# Altium PCB NB3000XN.PcbDoc (part 62 of 71)
Units mil, origin at the board's own origin, x right, y up, seen from the top; angles counter-clockwise.
Board outline 9527.56 x 6929.77 mil, 6 copper layers (Top Layer, GND+SHIELD, MidLayer1, MidLayer2, P2 - 3V3+5V0, Bottom Layer), stack 62.375 mil thick; 832 components, 1027 nets, 4655 pads, 4981 vias.
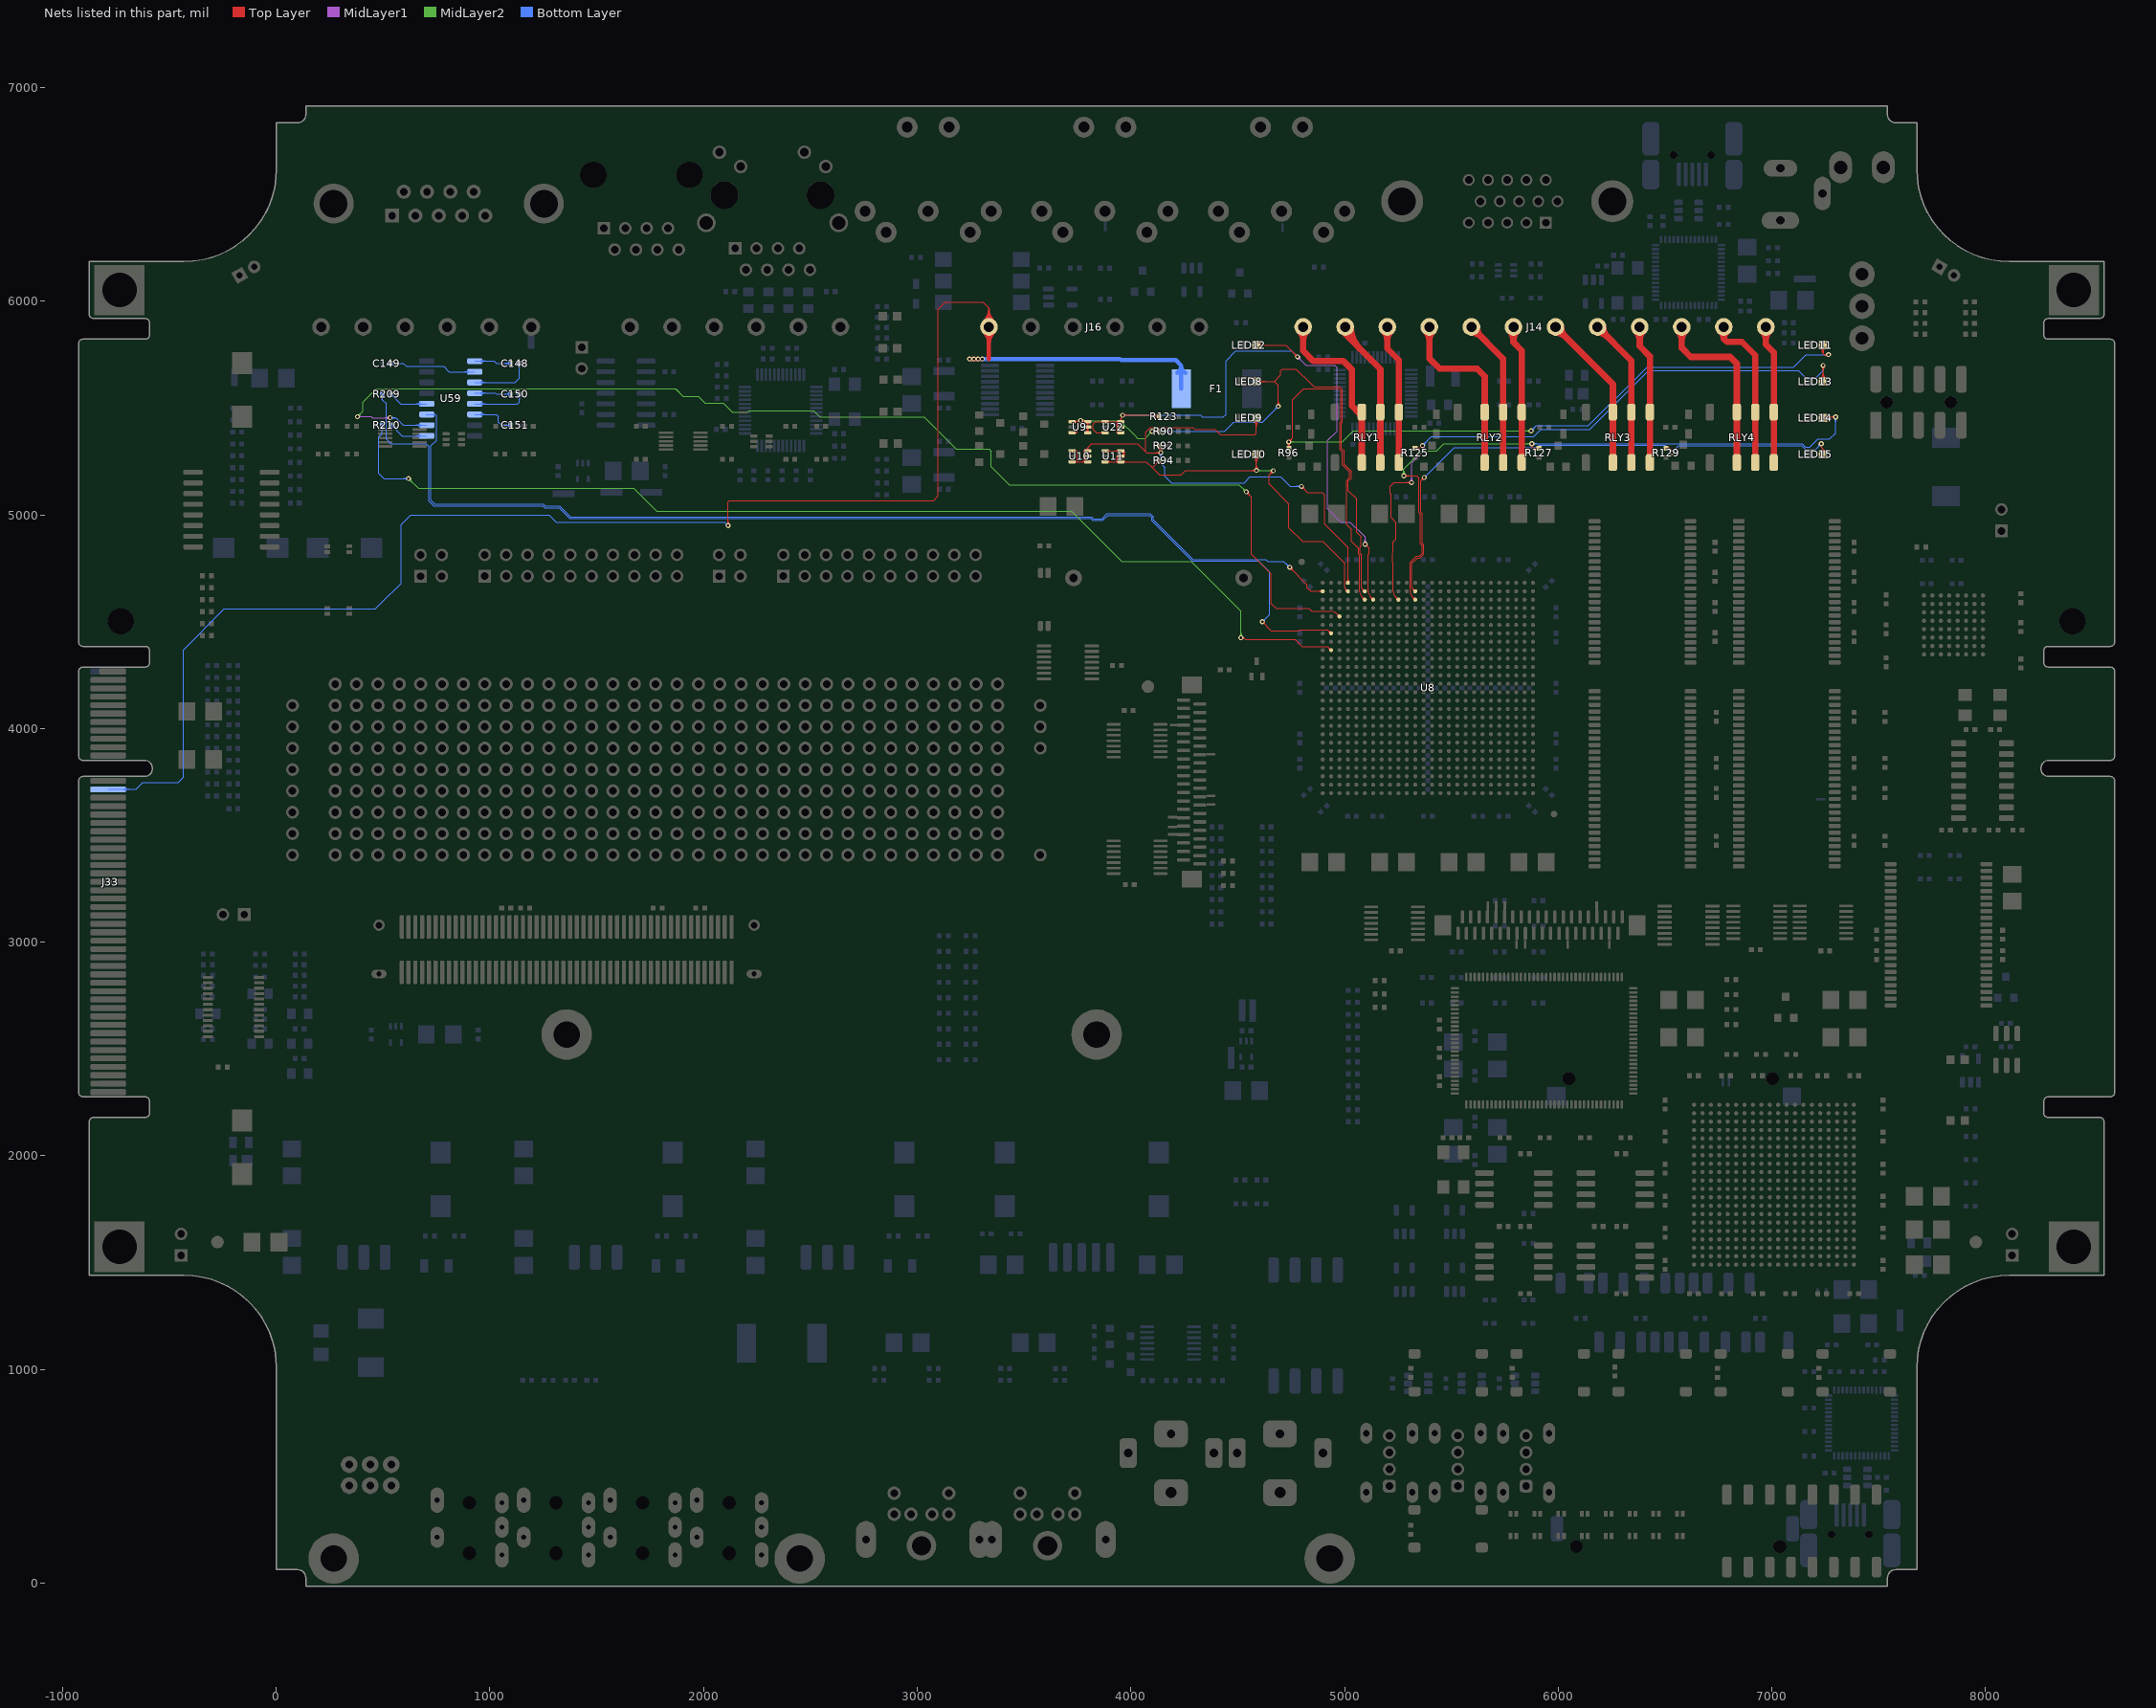
[diagram p66: the nets of this part, all layers, seen from the top]

## Via types
v1: diameter 23, hole 11.81, Top Layer to Bottom Layer, 3672 vias
v2: diameter 26, hole 11.81, Top Layer to Bottom Layer, 461 vias
v3: diameter 19, hole 11.81, Top Layer to Bottom Layer, tented both sides, 396 vias
v4: diameter 23.62, hole 11.81, Top Layer to Bottom Layer, 288 vias
v5: diameter 20, hole 11.81, Top Layer to Bottom Layer, 91 vias
v6: diameter 23, hole 11.81, Top Layer to Bottom Layer, tented both sides, 50 vias
v7: diameter 31, hole 11.81, Top Layer to Bottom Layer, 15 vias
v8: diameter 27.56, hole 11.81, Top Layer to Bottom Layer, tented both sides, 4 vias
v9: diameter 29, hole 11.81, Top Layer to Bottom Layer, 3 vias
v10: diameter 21, hole 11.81, Top Layer to Bottom Layer, 1 vias

## Nets (pads, with @x,y where several pads share a name; then routed paths per layer and width w, separated by ;. In a path a pad name is that pad's centre, name@x,y a point inside that pad or via, vN(x,y) a via of type N, cw(c..) or ccw(c..) an arc to the next point about the centre after c; other vN are vias at no path point) (continued)
PWM.PWM0: LED12.1 R123.1 U8.C7 U22.1 U22.3 U22.4 U22.5 U22.6 | length 4491.4
  Top Layer w4: U22.3@3866.99,5380.85 ccw(c3856.96,5370.82) 3856.96,5385 ccw(c3856.96,5399.18) U22.3@3866.99,5389.15 ; U22.1@3866.99,5432.03 ccw(c3856.96,5422) 3856.96,5436.18 ccw(c3856.96,5450.36) U22.1@3866.99,5440.33 ; U22.3@3880,5385 3839.23,5385 3823.52,5400.71 3823.52,5425.04 3834.66,5436.18 U22.1@3880,5436.18 3936.02,5436.18 ; U22.1@3893.01,5432.03 cw(c3903.04,5422) 3903.04,5436.18 cw(c3903.04,5450.36) U22.1@3893.01,5440.33 ; 3936.02,5383.79 cw(c3963.03,5383.79) U22.5@3947.38,5405.8 ; 3936.02,5388.38 ccw(c3946.19,5388.38) U22.4@3940.62,5379.88 ; 3936.02,5391.55 cw(c3957.52,5391.55) U22.5@3945.06,5409.06 ; 3936.02,5395.78 ccw(c3951.04,5395.78) U22.4@3942.81,5383.22 ; 3936.02,5399.3 cw(c3952.01,5399.3) U22.5@3942.74,5412.32 ; 3936.02,5403.19 ccw(c3955.89,5403.19) U22.4@3945,5386.57 ; 3936.02,5407.05 cw(c3946.49,5407.05) U22.5@3940.43,5415.58 ; 3936.02,5409.38 cw(c3963.03,5409.38) U22.6@3947.38,5431.39 ; 3936.02,5413.97 ccw(c3946.19,5413.97) U22.5@3940.62,5405.47 ; 3936.02,5417.14 cw(c3957.52,5417.14) U22.6@3945.06,5434.65 ; 3936.02,5421.37 ccw(c3951.04,5421.37) U22.5@3942.81,5408.81 ; 3936.02,5424.89 cw(c3952.01,5424.89) U22.6@3942.74,5437.91 ; 3936.02,5428.78 ccw(c3955.89,5428.78) U22.5@3945,5412.16 ; 3936.02,5432.64 cw(c3946.49,5432.64) U22.6@3940.43,5441.17 ; U22.4@3938.36,5383.27 ccw(c3936.02,5382.55) 3936.02,5385 ; U22.4@3938.36,5386.73 cw(c3936.02,5387.45) 3936.02,5385 ; U22.6@3939.82,5432.03 ccw(c3929.8,5422) 3929.8,5436.18 ccw(c3929.79,5450.36) U22.6@3939.82,5440.33 ; U22.4@3947.2,5389.91 cw(c3960.74,5410.59) 3936.02,5410.59 ; U22.5@3947.2,5415.5 cw(c3960.74,5436.18) 3936.02,5436.18 ; U22.6@3948.68,5440.33 ccw(c3938.65,5450.36) 3952.84,5450.36 ccw(c3967.01,5450.36) U22.6@3956.99,5440.33 ; U22.4@3952.83,5385 3936.02,5385 ; U22.5@3952.83,5410.59 3936.02,5410.59 ; 3952.84,5451.31 U22.6@3952.83,5436.18 3936.02,5436.18 ; 3952.86,5451.31 3961.52,5459.98 v1(3961.52,5466.71) 4127.11,5466.71 R123.1@4133.82,5460 ; v1@3965.41,5462.82 cw(c3974.8,5453.43) 3974.8,5466.71 cw(c3974.8,5479.99) v1@3965.41,5470.6 ; v1@3968.24,5459.99 cw(c3984.46,5443.77) 3984.46,5466.71 cw(c3984.46,5489.64) v1@3968.24,5473.43 ; 4096.31,5466.71 cw(c4096.31,5422.99) R123.1@4127.23,5453.9 ; 4105.97,5466.71 cw(c4105.97,5432.64) R123.1@4130.06,5456.73 ; 4115.63,5466.71 cw(c4115.63,5442.3) R123.1@4132.89,5459.56 ; LED12.1@4594.26,5788.44 cw(c4610.8,5771.91) 4610.8,5795.29 cw(c4610.8,5818.67) LED12.1@4594.26,5802.14 ; LED12.1@4597.09,5785.61 cw(c4620.45,5762.25) 4620.45,5795.29 cw(c4620.45,5828.33) LED12.1@4597.09,5804.97 ; LED12.1@4599.54,5788.95 cw(c4610,5783.49) 4610,5795.29 cw(c4610,5807.09) LED12.1@4599.54,5801.63 ; LED12.1@4599.92,5782.79 cw(c4630.11,5752.6) 4630.11,5795.29 cw(c4630.11,5837.99) LED12.1@4599.92,5807.8 ; LED12.1@4603.09,5787.1 cw(c4616.61,5780.04) 4616.61,5795.29 ; LED12.1@4603.09,5803.48 ccw(c4616.61,5810.54) 4616.61,5795.29 ; v1@4770.5,5740 ccw(c4747.56,5740) 4763.78,5756.22 ccw(c4780,5772.43) v1@4780,5749.5 ; v1@4774.5,5740 ccw(c4761.22,5740) 4770.61,5749.39 ccw(c4780,5758.78) v1@4780,5745.5 ; v1(4780,5740) 4724.71,5795.29 LED12.1@4587.42,5795.29 4616.61,5795.29 ; v1@5096.52,4853.54 cw(c5096.52,4830.61) 5112.74,4846.82 cw(c5128.96,4863.04) v1@5106.02,4863.04 ; v1@5096.52,4857.04 v1(5096.52,4863.04) 5115.19,4844.37 5115.19,4819.62 5110.23,4814.66 5110.23,4740.42 5110.23,4737 5110.23,4724.74 5110.23,4720 5110.23,4710 5110.23,4643.27 ; v1@5096.52,4857.54 cw(c5096.52,4844.26) 5105.91,4853.65 cw(c5115.3,4863.04) v1@5102.02,4863.04 ; 3936.02,5385 3936.02,5410.59 ; 3936.02,5410.59 cw(c3936.02,5408.14) U22.5@3938.36,5408.86 ; 3936.02,5410.59 ccw(c3936.02,5413.03) U22.5@3938.36,5412.32 ; 3936.02,5410.59 cw(c3936.02,5408.14) U22.5@3938.36,5408.86 ; 3936.02,5410.59 ccw(c3936.02,5413.03) U22.5@3938.36,5412.32 ; 3936.02,5410.59 cw(c3936.02,5408.15) U22.5@3938.36,5408.86 ; 3936.02,5410.59 ccw(c3936.02,5413.04) U22.5@3938.36,5412.32 ; 3936.02,5410.59 3936.02,5436.18 ; 3936.02,5436.18 cw(c3936.02,5433.74) 3938.36,5434.45 ccw(c3936.02,5433.74) 3936.02,5436.18 ; 3936.02,5436.18 ccw(c3936.02,5438.63) 3938.36,5437.91 cw(c3936.02,5438.63) 3936.02,5436.18 ; 5110.23,4643.27 ccw(c5148.91,4643.27) 5121.56,4615.92 ; 5110.23,4643.27 ccw(c5148.91,4643.27) 5121.56,4615.92 ; 5121.56,4615.92 cw(c5109.03,4603.39) 5126.75,4603.39 ccw(c5109.03,4603.39) 5121.56,4615.92 ; 5121.56,4615.92 ccw(c5134.09,4628.45) 5134.09,4610.73 cw(c5134.09,4628.45) 5121.56,4615.92
  MidLayer1 w4: v1@4780,5730.5 cw(c4780,5707.56) 4796.22,5723.78 cw(c4812.43,5740) v1@4789.5,5740 ; v1@4780,5734.5 cw(c4780,5721.22) 4789.39,5730.61 cw(c4798.78,5740) v1@4785.5,5740 ; v1(4780,5740) 4819.63,5700.37 4953.54,5700.37 4965.52,5688.39 4965.52,5392.35 4921.52,5348.35 4921.52,5027.63 4982.11,4967.04 5025.13,4967.04 5096.52,4895.65 v1(5096.52,4863.04) ; v1@5089.81,4869.76 ccw(c5073.59,4885.98) 5096.52,4885.98 ccw(c5119.46,4885.98) v1@5103.24,4869.76 ; v1@5092.64,4866.93 ccw(c5083.25,4876.32) 5096.52,4876.32 ccw(c5109.8,4876.32) v1@5100.41,4866.93
  Bottom Layer w4: v1(3961.52,5466.71) 4326.17,5466.71 4334.83,5458.04 4433.04,5458.04 4445,5470 4445,5721.71 4490,5766.71 4753.29,5766.71 v1(4780,5740) ; v1@3965.41,5462.82 cw(c3974.8,5453.43) 3974.8,5466.71 cw(c3974.8,5479.99) v1@3965.41,5470.6 ; v1@3968.24,5459.99 cw(c3984.46,5443.77) 3984.46,5466.71 cw(c3984.46,5489.64) v1@3968.24,5473.43 ; v1@4770.5,5740 ccw(c4747.56,5740) 4763.78,5756.22 ccw(c4780,5772.43) v1@4780,5749.5 ; v1@4774.5,5740 ccw(c4761.22,5740) 4770.61,5749.39 ccw(c4780,5758.78) v1@4780,5745.5
PWM.PWM1: LED8.1 R90.1 U8.B6 U9.1 U9.3 U9.4 U9.5 U9.6 | length 3726.6
  Top Layer w4: U9.3@3725,5385 3746.86,5385 ; U9.1@3725,5436.18 3746.86,5436.18 ; U9.3@3738.27,5381.12 cw(c3746.86,5373.56) 3746.86,5385 ; U9.3@3738.27,5388.88 ccw(c3746.86,5396.44) 3746.86,5385 ; U9.1@3738.27,5432.3 cw(c3746.86,5424.74) 3746.86,5436.18 ; U9.1@3738.27,5440.06 ccw(c3746.86,5447.62) 3746.86,5436.18 ; 3748.48,5437.8 cw(c3758.11,5428.17) v1@3764.19,5440.37 ; 3752.41,5441.74 cw(c3760.73,5433.42) v1@3765.97,5443.95 ; v1@3765.99,5442.69 ccw(c3780.28,5455.11) 3780.28,5436.18 ; v1@3769.01,5445.32 ccw(c3789.06,5462.75) U9.6@3789.06,5436.18 ; v1@3772.03,5447.94 ccw(c3797.83,5470.38) U9.6@3797.83,5436.18 ; U9.6@3784.82,5432.03 ccw(c3774.8,5422) 3774.8,5436.18 ccw(c3774.79,5450.36) U9.6@3784.82,5440.33 ; U9.4@3793.68,5389.15 ccw(c3783.65,5399.18) 3797.84,5399.18 ccw(c3812.01,5399.18) U9.4@3801.99,5389.15 ; U9.5@3793.68,5406.44 cw(c3783.65,5396.41) 3797.84,5396.41 cw(c3812.01,5396.41) U9.5@3801.99,5406.44 ; U9.5@3793.68,5414.74 ccw(c3783.65,5424.77) 3797.84,5424.77 ccw(c3812.01,5424.77) U9.5@3801.99,5414.74 ; U9.6@3793.68,5432.03 cw(c3783.65,5422) 3797.84,5422 ; U9.4@3797.83,5385 U9.5@3797.83,5410.59 U9.6@3797.83,5436.18 ; 3797.84,5422 cw(c3812.01,5422) U9.6@3801.99,5432.03 ; v1(4099.19,5391.37) 4115.19,5391.37 ; v1@4107.53,5386.83 cw(c4115.19,5382.65) 4115.19,5391.37 ; v1@4107.53,5395.92 ccw(c4115.19,5400.1) 4115.19,5391.37 ; R90.1@4126.27,5385.71 ccw(c4115.19,5377.71) 4115.19,5391.37 ; R90.1@4126.29,5386.17 ccw(c4115.48,5378.29) 4115.48,5391.67 ; R90.1@4126.29,5397.16 cw(c4115.48,5405.05) 4115.48,5391.67 ; R90.1@4126.46,5396.89 cw(c4115.19,5405.64) 4115.19,5391.37 ; LED8.1@4587.42,5624.9 4671.52,5624.9 ; LED8.1@4594.26,5618.06 cw(c4610.8,5601.52) 4610.8,5624.9 cw(c4610.8,5648.29) LED8.1@4594.26,5631.75 ; LED8.1@4597.09,5615.23 cw(c4620.45,5591.87) 4620.45,5624.9 cw(c4620.45,5657.94) LED8.1@4597.09,5634.58 ; LED8.1@4599.92,5612.4 cw(c4630.11,5582.21) 4630.11,5624.9 cw(c4630.11,5667.6) LED8.1@4599.92,5637.41 ; v1@4683.47,5515.09 ccw(c4667.26,5531.31) 4690.19,5531.31 ccw(c4713.13,5531.31) v1@4696.91,5515.09 ; v1@4686.3,5512.26 ccw(c4676.91,5521.65) 4690.19,5521.65 ccw(c4703.47,5521.65) v1@4694.08,5512.26 ; v1(4690.19,5508.37) 4690.19,5606.24 4671.52,5624.9 ; 3746.86,5385 3748.52,5386.67 3748.52,5434.51 3746.86,5436.18 ; 3746.86,5436.18 3752.38,5441.71 v1(3764.86,5441.71) 3764.86,5441.51 3770.19,5436.18 U9.6@3797.83,5436.18 ; 4115.19,5391.37 4115.48,5391.67 ; 4115.19,5391.37 4133.53,5391.37 R90.1@4133.82,5391.67 4115.48,5391.67 ; 4671.52,5624.9 4701.86,5655.24 4701.86,5675.04 4710.19,5683.37 4773.52,5683.37 4839.69,5617.2 4856.86,5600.04 4975.52,5600.04 4990.19,5585.37 4990.19,5465 4990.19,5433.88 4986,5429.69 4986,5310.86 4997.86,5299 4997.86,5238 5006.86,5229 5031.86,5204 5031.86,5172.06 5017.5,5157.7 5017.5,5125 ; 5017.5,5114.04 5056.7,5074.85 5056.7,4919.56 5077.52,4898.73 5077.52,4853.37 5073.52,4849.37 5073.52,4819.59 5079.22,4813.89 5079.22,4724.74 5079.22,4720 5079.22,4710 5079.22,4662.47 ; 5017.5,5114.04 5017.5,5125 ; 5017.5,5114.04 5017.5,5125 ; 5079.22,4662.47 ccw(c5089.37,4662.47) 5082.19,4655.29 ; 5079.22,4662.47 ccw(c5089.37,4662.47) 5082.19,4655.29 ; 5082.19,4655.29 ccw(c5094.72,4667.83) 5094.72,4650.1 cw(c5094.72,4667.83) 5082.19,4655.29 ; 5082.19,4655.29 cw(c5069.66,4642.76) 5087.38,4642.76 ccw(c5069.66,4642.76) 5082.19,4655.29
  MidLayer2 w4: v1(3764.86,5441.71) 3948.52,5441.71 4015.19,5375.04 ; v1@3768.75,5437.82 cw(c3778.14,5428.43) 3778.14,5441.71 cw(c3778.14,5454.99) v1@3768.75,5445.6 ; v1@3771.57,5434.99 cw(c3787.79,5418.77) 3787.79,5441.71 cw(c3787.79,5464.64) v1@3771.57,5448.43 ; v1@4089.69,5391.37 cw(c4066.76,5391.37) 4082.97,5375.16 cw(c4099.19,5358.94) v1@4099.19,5381.87 ; v1@4093.69,5391.37 cw(c4080.41,5391.37) 4089.8,5381.99 cw(c4099.19,5372.6) v1@4099.19,5385.87 ; v1(4099.19,5391.37) 4066.19,5358.37 4031.86,5358.37 ; 4015.19,5375.04 4031.86,5358.37 ; 4015.19,5375.04 4031.86,5358.37
  Bottom Layer w4: v1(4099.19,5391.37) 4438.52,5391.37 4480.52,5433.37 4615.19,5433.37 v1(4690.19,5508.37) ; v1@4103.08,5387.49 cw(c4112.47,5378.1) 4112.47,5391.37 cw(c4112.47,5404.65) v1@4103.08,5395.26 ; v1@4105.91,5384.66 cw(c4122.13,5368.44) 4122.13,5391.37 cw(c4122.13,5414.31) v1@4105.91,5398.09 ; v1@4680.69,5508.37 cw(c4657.76,5508.37) 4673.97,5492.16 cw(c4690.19,5475.94) v1@4690.19,5498.87 ; v1@4684.69,5508.37 cw(c4671.41,5508.37) 4680.8,5498.99 cw(c4690.19,5489.6) v1@4690.19,5502.87
PWM.PWM2: LED9.1 R92.1 U8.A4 U10.1 U10.3 U10.4 U10.5 U10.6 | length 3714.7
  Top Layer w4: U10.3@3725,5248.82 3748.52,5248.82 ; U10.1@3725,5300 3746.86,5300 ; U10.3@3738.01,5244.67 cw(c3748.04,5234.64) 3748.04,5248.82 cw(c3748.04,5263) U10.3@3738.01,5252.97 ; U10.1@3738.27,5296.12 cw(c3746.86,5288.56) 3746.86,5300 ; U10.1@3738.27,5303.88 ccw(c3746.86,5311.44) 3746.86,5300 ; 3780.19,5247.35 cw(c3806.61,5247.35) U10.5@3792.18,5269.49 ; 3780.19,5248.82 3780.19,5274.41 ; 3780.19,5253.46 ccw(c3791.7,5253.46) U10.4@3785.88,5243.53 ; 3780.19,5254.74 cw(c3801.8,5254.74) U10.5@3790,5272.84 ; 3780.19,5260.44 ccw(c3795.79,5260.44) U10.4@3787.9,5246.98 ; 3780.19,5262.12 cw(c3796.99,5262.12) U10.5@3787.82,5276.19 ; 3780.19,5267.43 ccw(c3799.88,5267.43) U10.4@3789.92,5250.44 ; 3780.19,5269.5 cw(c3792.18,5269.5) U10.5@3785.63,5279.54 ; 3780.19,5272.94 cw(c3806.61,5272.94) U10.6@3792.18,5295.08 ; 3780.19,5279.05 ccw(c3791.7,5279.05) U10.5@3785.88,5269.12 ; 3780.19,5280.33 cw(c3801.8,5280.33) U10.6@3790,5298.43 ; 3780.19,5286.03 ccw(c3795.79,5286.03) U10.5@3787.9,5272.58 ; 3780.19,5287.71 cw(c3796.99,5287.71) U10.6@3787.82,5301.78 ; 3780.19,5293.02 ccw(c3799.89,5293.02) U10.5@3789.92,5276.03 ; 3780.19,5295.09 cw(c3792.18,5295.09) U10.6@3785.63,5305.13 ; 3780.19,5300 ccw(c3803.98,5300) U10.5@3791.95,5279.48 ; U10.6@3783.55,5297.75 ccw(c3780.19,5296.37) 3780.19,5300 ; U10.6@3783.55,5302.24 cw(c3780.19,5303.63) 3780.19,5300 ; U10.4@3784.82,5244.67 ccw(c3774.8,5234.64) 3774.8,5248.82 ccw(c3774.79,5263) U10.4@3784.82,5252.97 ; U10.4@3791.95,5253.89 cw(c3803.98,5274.41) 3780.19,5274.41 ; U10.6@3793.68,5304.15 ccw(c3783.65,5314.18) 3797.84,5314.18 ccw(c3812.01,5314.18) U10.6@3801.99,5304.15 ; U10.4@3797.83,5248.82 3748.52,5248.82 ; U10.5@3797.83,5274.41 3780.19,5274.41 ; R92.1@4128.15,5315.44 cw(c4109.48,5291.06) v1@4140.19,5291.06 ; R92.1@4130.59,5318.62 cw(c4115.69,5299.16) v1@4140.19,5299.16 ; R92.1@4133.02,5321.79 cw(c4121.89,5307.27) 4140.19,5307.27 ; v1@4133.47,5284.99 ccw(c4117.26,5268.77) 4117.26,5291.71 ccw(c4117.26,5314.64) 4133.47,5298.43 ccw(c4117.26,5314.64) 4140.19,5314.64 ccw(c4163.13,5314.64) v1@4146.91,5298.43 ; v1@4136.3,5287.82 ccw(c4126.91,5278.43) 4126.91,5291.71 ccw(c4126.91,5304.99) 4136.3,5295.6 ccw(c4126.91,5304.99) 4140.19,5304.99 ccw(c4153.47,5304.99) v1@4144.08,5295.6 ; R92.1@4140.19,5316.96 v1(4140.19,5291.71) 4073.29,5291.71 4070,5295 ; LED9.1@4574.91,5442.01 cw(c4544.72,5411.82) 4587.42,5411.82 cw(c4630.11,5411.82) LED9.1@4599.92,5442.01 ; LED9.1@4577.74,5444.84 cw(c4554.38,5421.48) 4587.42,5421.48 cw(c4620.45,5421.48) LED9.1@4597.09,5444.84 ; LED9.1@4580.57,5447.67 cw(c4564.03,5431.14) 4587.42,5431.14 cw(c4610.8,5431.14) LED9.1@4594.26,5447.67 ; LED9.1@4587.42,5454.52 4587.42,5382.42 4579.71,5374.71 4418.46,5374.71 4393.17,5400 4299.71,5400 4290,5409.71 4092.77,5409.71 4070,5386.93 4070,5295 ; v1@4798.52,5123.87 cw(c4798.52,5100.94) 4814.74,5117.16 cw(c4830.96,5133.37) v1@4808.02,5133.37 ; v1@4798.52,5127.87 cw(c4798.52,5114.6) 4807.91,5123.99 cw(c4817.3,5133.37) v1@4804.02,5133.37 ; v1(4798.52,5133.37) 4826.9,5105 4895,5105 4907.19,5092.81 4907.19,4957.06 4906.86,4956.73 5015.98,4847.6 5015.98,4720 5015.98,4710 U8.A4@5015.98,4682.13 ; U8.A4@5010.68,4687.43 ccw(c4997.88,4700.23) 5015.98,4700.23 ccw(c5034.09,4700.23) U8.A4@5021.29,4687.43 ; U8.A4@5010.79,4687.32 ccw(c4998.26,4699.85) 5015.98,4699.85 ccw(c5033.71,4699.85) U8.A4@5021.18,4687.32 ; 3746.86,5300 3748.52,5298.33 3748.52,5248.82 ; 3780.19,5274.41 cw(c3780.19,5270.77) U10.5@3783.55,5272.16 ; 3780.19,5274.41 ccw(c3780.19,5278.04) U10.5@3783.55,5276.65 ; 3780.19,5274.41 cw(c3780.19,5270.78) U10.5@3783.55,5272.16 ; 3780.19,5274.41 ccw(c3780.19,5278.04) U10.5@3783.55,5276.65 ; 3780.19,5274.41 cw(c3780.19,5270.78) U10.5@3783.55,5272.16 ; 3780.19,5274.41 ccw(c3780.19,5278.04) U10.5@3783.55,5276.65 ; 3780.19,5274.41 3780.19,5300 ; 3780.19,5300 U10.6@3797.83,5300 3797.84,5314.35 3816.86,5333.37 4031.63,5333.37 4070,5295
  Bottom Layer w4: v1@4133.47,5284.99 cw(c4117.26,5268.77) 4140.19,5268.77 cw(c4163.13,5268.77) v1@4146.91,5284.99 ; v1@4136.3,5287.82 cw(c4126.91,5278.43) 4140.19,5278.43 cw(c4153.47,5278.43) v1@4144.08,5287.82 ; v1(4140.19,5291.71) 4140.19,5241.71 4159.82,5222.08 4159.82,5180.18 4189.81,5150.19 4530.19,5150.19 4557.81,5177.81 4701.09,5177.81 4714.49,5164.41 4745.52,5133.37 v1(4798.52,5133.37) ; v1@4791.81,5126.66 ccw(c4775.59,5110.44) 4775.59,5133.37 ccw(c4775.59,5156.31) v1@4791.81,5140.09 ; v1@4794.64,5129.49 ccw(c4785.25,5120.1) 4785.25,5133.37 ccw(c4785.25,5146.65) v1@4794.64,5137.26
PWM.PWM3: LED10.1 R94.1 U8.B4 U11.1 U11.3 U11.4 U11.5 U11.6 | length 2931.5
  Top Layer w4: U11.3@3880,5248.82 U11.4@3952.83,5248.82 4072.34,5248.82 ; U11.1@3880,5300 U11.6@3952.83,5300 3970.9,5300 ; U11.3@3893.01,5244.67 cw(c3903.04,5234.64) 3903.04,5248.82 cw(c3903.04,5263) U11.3@3893.01,5252.97 ; U11.1@3893.01,5295.85 cw(c3903.04,5285.82) 3903.04,5300 cw(c3903.04,5314.18) U11.1@3893.01,5304.15 ; 3935.19,5247.35 cw(c3961.61,5247.35) U11.5@3947.18,5269.49 ; 3935.19,5248.82 3935.19,5274.41 ; 3935.19,5253.46 ccw(c3946.7,5253.46) U11.4@3940.88,5243.53 ; 3935.19,5254.74 cw(c3956.8,5254.74) U11.5@3945,5272.84 ; 3935.19,5260.44 ccw(c3950.79,5260.44) U11.4@3942.9,5246.98 ; 3935.19,5262.12 cw(c3951.99,5262.12) U11.5@3942.82,5276.19 ; 3935.19,5267.43 ccw(c3954.88,5267.43) U11.4@3944.92,5250.44 ; 3935.19,5269.5 cw(c3947.18,5269.5) U11.5@3940.63,5279.54 ; U11.5@3938.55,5272.16 ccw(c3935.19,5270.77) 3935.19,5274.41 ; U11.5@3938.55,5276.65 cw(c3935.19,5278.04) 3935.19,5274.41 ; U11.4@3939.82,5244.67 ccw(c3929.8,5234.64) 3929.8,5248.82 ccw(c3929.79,5263) U11.4@3939.82,5252.97 ; U11.6@3939.82,5295.85 ccw(c3929.8,5285.82) 3929.8,5300 ccw(c3929.79,5314.18) U11.6@3939.82,5304.15 ; U11.4@3946.95,5253.89 cw(c3958.98,5274.41) 3935.19,5274.41 ; U11.6@3958.58,5295.02 cw(c3944.71,5272.8) 3970.9,5272.8 ; U11.5@3958.85,5279.55 ccw(c3947.52,5300) 3970.9,5300 ; U11.6@3960.7,5298.41 cw(c3949.22,5280.02) 3970.9,5280.02 ; U11.5@3960.79,5276.05 ccw(c3951.28,5293.21) 3970.9,5293.21 ; U11.5@3962.72,5272.55 ccw(c3955.04,5286.42) 3970.9,5286.42 ; U11.6@3962.82,5301.8 cw(c3953.72,5287.23) 3970.9,5287.23 ; U11.5@3964.66,5269.05 ccw(c3958.8,5279.64) 3970.9,5279.64 ; U11.6@3964.94,5305.2 cw(c3958.22,5294.45) 3970.9,5294.45 ; U11.4@3965.85,5244.67 cw(c3975.87,5234.64) 3975.87,5248.82 cw(c3975.87,5263) U11.4@3965.85,5252.97 ; U11.6@3967.02,5297.52 cw(c3970.9,5295.72) 3970.9,5300 ; U11.6@3967.02,5302.47 ccw(c3970.9,5304.28) 3970.9,5300 ; 4117.07,5238.25 cw(c4133.82,5221.5) R94.1@4133.82,5245.19 ; 4118.26,5239.44 ccw(c4103.19,5254.51) R94.1@4124.5,5254.51 ; R94.1@4123.9,5245.08 cw(c4133.82,5235.16) R94.1@4133.82,5249.19 ; R94.1@4125.09,5246.27 ccw(c4116.85,5254.51) R94.1@4128.5,5254.51 ; R94.1@4133.82,5255 4099.99,5221.17 ; LED10.1@4574.91,5271.63 cw(c4544.72,5241.44) 4587.42,5241.44 cw(c4630.11,5241.43) LED10.1@4599.92,5271.63 ; LED10.1@4577.74,5274.45 cw(c4554.38,5251.09) 4587.42,5251.09 cw(c4620.45,5251.09) LED10.1@4597.09,5274.45 ; LED10.1@4580.57,5277.28 cw(c4564.03,5260.75) 4587.42,5260.75 cw(c4610.8,5260.75) LED10.1@4594.26,5277.28 ; v1@4581.47,5201.66 ccw(c4565.26,5185.44) 4565.26,5208.37 ccw(c4565.26,5231.31) 4581.47,5215.09 ccw(c4567.13,5229.44) 4587.42,5229.44 ; v1@4584.3,5204.49 ccw(c4574.91,5195.1) 4574.91,5208.37 ccw(c4574.91,5221.65) v1@4584.3,5212.26 ; 4587.42,5223.52 ccw(c4603.34,5223.52) v1@4592.08,5212.26 ; 4587.42,5233.18 ccw(c4613,5233.18) v1@4594.91,5215.09 ; LED10.1@4587.42,5284.13 4587.42,5209.1 v1@4588.14,5208.37 ; v1(4588.19,5208.37) v1@4588.14,5208.37 ; v1@4657.36,5206.71 cw(c4634.42,5206.71) 4650.64,5190.49 cw(c4666.86,5174.27) v1@4666.86,5197.21 ; v1@4661.36,5206.71 cw(c4648.08,5206.71) 4657.47,5197.32 cw(c4666.86,5187.93) v1@4666.86,5201.21 ; v1(4666.86,5206.71) 4648.19,5188.04 4648.19,5144.02 4740.19,5052.02 4740.19,5000 4740.19,4950.04 4740.19,4939.34 4803.82,4875.71 4898.11,4875.71 4899.61,4874.21 4899.73,4874.21 5000.48,4773.46 5000.48,4724.74 5000.48,4720 5000.48,4710 5000.48,4662.47 ; 3935.19,5274.41 U11.5@3952.83,5274.41 3970.9,5274.41 ; U11.5@3967.02,5271.93 cw(c3970.9,5270.13) 3970.9,5274.41 ; U11.5@3967.02,5271.93 cw(c3970.9,5270.13) 3970.9,5274.41 ; U11.5@3967.02,5271.93 cw(c3970.9,5270.13) 3970.9,5274.41 ; U11.5@3967.02,5276.88 ccw(c3970.9,5278.69) 3970.9,5274.41 ; U11.5@3967.02,5276.88 ccw(c3970.9,5278.69) 3970.9,5274.41 ; U11.5@3967.02,5276.88 ccw(c3970.9,5278.69) 3970.9,5274.41 ; 3970.9,5274.41 3970.9,5300 ; 4072.34,5248.82 4099.99,5221.17 ; 4072.34,5248.82 4099.99,5221.17 ; 4099.99,5221.17 4133.82,5187.34 4235,5187.34 4256.03,5208.37 v1@4588.14,5208.37 ; 5000.48,4662.47 ccw(c5010.63,4662.47) 5003.45,4655.29 ; 5000.48,4662.47 ccw(c5010.63,4662.47) 5003.45,4655.29 ; 5003.45,4655.29 ccw(c5015.98,4667.83) 5015.98,4650.1 cw(c5015.98,4667.83) 5003.45,4655.29 ; 5003.45,4655.29 cw(c4990.92,4642.76) 5008.64,4642.76 ccw(c4990.92,4642.76) 5003.45,4655.29
  MidLayer2 w4: v1(4588.19,5208.37) 4589.86,5206.71 v1(4666.86,5206.71) ; v1@4592.08,5212.26 ccw(c4605.49,5225.68) 4605.49,5206.71 ; v1@4594.91,5201.66 cw(c4607.1,5189.46) 4607.1,5206.71 ; v1@4594.91,5215.09 ccw(c4615.15,5235.33) 4615.15,5206.71 ; v1@4660.14,5199.99 ccw(c4643.92,5183.77) 4643.92,5206.71 ccw(c4643.92,5229.64) v1@4660.14,5213.43 ; v1@4662.97,5202.82 ccw(c4653.58,5193.43) 4653.58,5206.71 ccw(c4653.58,5219.99) v1@4662.97,5210.6
PWMPWR: F1.2 J16.1 J33.B13 | length 8596
  Top Layer w4: v1@2108.47,4956.76 ccw(c2092.26,4972.98) 2115.19,4972.98 ccw(c2138.13,4972.98) v1@2121.91,4956.76 ; v1@2111.3,4953.93 ccw(c2101.91,4963.32) 2115.19,4963.32 ccw(c2128.47,4963.32) v1@2119.08,4953.93 ; v1(2115.19,4950.04) 2115.19,5060.19 2122,5067 3077,5067 3098.19,5088.19 3098.19,5963.19 3132.06,5997.06 3307.94,5997.06 3335.92,5969.08 ; J16.1@3309.42,5909.08 ccw(c3254.75,5969.08) 3335.92,5969.08 ; J16.1@3312.12,5906.13 ccw(c3263,5960.02) 3335.92,5960.02 ccw(c3408.83,5960.02) J16.1@3359.72,5906.13 ; J16.1@3314.81,5903.17 ccw(c3271.26,5950.96) 3335.92,5950.96 ccw(c3400.58,5950.96) J16.1@3357.03,5903.17 ; J16.1@3317.5,5900.21 ccw(c3279.51,5941.91) 3335.92,5941.91 ccw(c3392.33,5941.91) J16.1@3354.33,5900.21 ; J16.1@3320.2,5897.26 ccw(c3287.76,5932.85) 3335.92,5932.85 ccw(c3384.07,5932.85) J16.1@3351.64,5897.26 ; J16.1@3322.89,5894.3 ccw(c3296.02,5923.79) 3335.92,5923.79 ccw(c3375.82,5923.79) J16.1@3348.94,5894.3 ; J16.1@3335.92,5880.01 3335.92,5969.08 ; J16.1@3362.41,5909.08 cw(c3417.09,5969.08) 3335.92,5969.08
  Top Layer w20: v1(3245,5730) v1@3290.19,5730 ; J16.1@3313.76,5857.85 cw(c3260.26,5804.35) 3335.92,5804.35 cw(c3411.58,5804.35) J16.1@3358.08,5857.85 ; 3335.92,5730 J16.1@3335.92,5880.01
  Bottom Layer w4: J33.B13@-785.98,3715.85 -655,3715.85 -623.63,3747.22 -459.09,3747.22 -435,3771.31 -435,4368.89 -243.85,4560.04 303.39,4560.04 ; J33.B13@-711.58,3710.35 cw(c-698.3,3697.07) -698.3,3715.85 cw(c-698.3,3734.63) J33.B13@-711.58,3721.35 ; J33.B13@-708.76,3707.52 cw(c-688.65,3687.41) -688.65,3715.85 cw(c-688.65,3744.29) J33.B13@-708.76,3724.18 ; 303.43,4560 465.15,4560 493.84,4588.69 585.21,4680.06 585.21,4953.9 630.5,4999.19 1277.52,4999.19 1310,4966.71 2098.52,4966.71 v1(2115.19,4950.04) ; v1@2105.69,4950.04 ccw(c2082.76,4950.04) 2098.97,4966.26 ccw(c2115.19,4982.48) v1@2115.19,4959.54 ; v1@2109.69,4950.04 ccw(c2096.41,4950.04) 2105.8,4959.43 ccw(c2115.19,4968.82) v1@2115.19,4955.54
  Bottom Layer w20: v1(3245,5730) 3949.17,5730 3954.63,5724.54 4210.46,5724.54 4235.75,5699.25 ; F1.2@4216.92,5665.11 ccw(c4195.38,5699.25) 4235.75,5699.25 ; F1.2@4235.75,5590 4235.75,5699.25 ; F1.2@4254.57,5665.11 cw(c4276.12,5699.25) 4235.75,5699.25
  other v1: 3265,5730 3285,5730 3305,5730
RELAY.RELAY0: LED11.1 R96.1 U8.C6 | length 5062.8
  Top Layer w4: v1@4732.47,5334.99 cw(c4714.3,5316.82) R96.1@4740,5316.82 ; R96.1@4733.41,5317.77 ccw(c4717.5,5333.68) 4740,5333.68 ccw(c4762.5,5333.68) R96.1@4746.59,5317.77 ; v1@4735.3,5337.82 cw(c4723.96,5326.47) 4740,5326.47 ; R96.1@4736.24,5314.94 ccw(c4727.16,5324.02) 4740,5324.02 ccw(c4752.84,5324.02) R96.1@4743.76,5314.94 ; v1@4739.19,5347.21 ccw(c4739.19,5360.49) 4748.58,5351.1 ccw(c4757.97,5341.71) v1@4744.69,5341.71 ; v1@4739.19,5351.21 ccw(c4739.19,5374.14) 4755.41,5357.93 ccw(c4771.63,5341.71) v1@4748.69,5341.71 ; R96.1@4740,5311.18 4740,5341.04 4739.33,5341.71 v1(4739.19,5341.71) 4756.86,5359.37 4756.86,5540.04 4808.52,5591.71 4950,5591.71 4966.86,5591.71 4972.54,5591.71 4982.19,5582.06 4982.19,5576.37 4982.19,5437.19 ; R96.1@4740,5320.73 cw(c4760.17,5320.73) v1@4745.91,5334.99 ; 4982.19,5570 4982.19,5437.19 ; 5065,4844 5065,4843.84 ; LED11.1@7227.37,5782.07 cw(c7204.06,5755.88) 7239.12,5755.88 ; LED11.1@7230.03,5785.06 cw(c7211.99,5764.79) 7239.12,5764.79 cw(c7266.25,5764.79) LED11.1@7248.22,5785.06 ; LED11.1@7232.69,5788.05 cw(c7219.92,5773.7) 7239.12,5773.7 cw(c7258.32,5773.7) LED11.1@7245.56,5788.05 ; LED11.1@7239.12,5795.28 7239.12,5755.88 ; LED11.1@7250.88,5782.07 ccw(c7274.18,5755.88) 7239.12,5755.88 ; v1@7257.88,5743.97 ccw(c7244.96,5733.25) 7244.96,5750.04 ; v1@7257.88,5756.11 cw(c7244.96,5766.83) 7244.96,5750.04 ; v1@7260.96,5746.53 ccw(c7253.48,5740.32) 7253.48,5750.04 ccw(c7253.48,5759.76) v1@7260.96,5753.55 ; v1(7265.19,5750.04) 7244.96,5750.04 ; 4982.19,5437.19 4978,5433 4978,5306.88 4989.86,5295.02 4989.86,5234.69 5023.52,5201.02 5023.52,5175.04 5010.19,5161.71 5009.5,5161.02 5009.5,4955.73 5010.19,4955.04 5031.86,4933.37 5031.86,4876.98 5065,4843.84 ; 5065,4843.84 5065,4816.8 5070.86,4810.93 5070.86,4724.74 5070.86,4720 5070.86,4710 5070.86,4643.27 ; 5070.86,4643.27 ccw(c5109.54,4643.27) 5082.19,4615.92 ; 5070.86,4643.27 ccw(c5109.54,4643.27) 5082.19,4615.92 ; 5082.19,4615.92 cw(c5069.66,4603.39) 5087.38,4603.39 ccw(c5069.66,4603.39) 5082.19,4615.92 ; 5082.19,4615.92 ccw(c5094.72,4628.45) 5094.72,4610.73 cw(c5094.72,4628.45) 5082.19,4615.92 ; 7239.12,5755.88 7244.96,5750.04
  MidLayer2 w4: v1(4739.19,5341.71) 4990.19,5341.71 5041.86,5393.37 v1(5873.52,5393.37) ; v1@4743.08,5337.82 cw(c4752.47,5328.43) 4752.47,5341.71 cw(c4752.47,5354.99) v1@4743.08,5345.6 ; v1@4745.91,5334.99 cw(c4762.13,5318.77) 4762.13,5341.71 cw(c4762.13,5364.64) v1@4745.91,5348.43 ; v1@5866.81,5386.66 ccw(c5850.59,5370.44) 5850.59,5393.37 ccw(c5850.59,5416.31) v1@5866.81,5400.09 ; v1@5869.64,5389.49 ccw(c5860.25,5380.1) 5860.25,5393.37 ccw(c5860.25,5406.65) v1@5869.64,5397.26
  Bottom Layer w4: v1(5873.52,5393.37) 5897.52,5417.37 6140.86,5417.37 6373.52,5650.04 6415.52,5692.04 7101.84,5692.04 7159.84,5750.04 v1(7265.19,5750.04) ; v1@5873.52,5398.87 ccw(c5873.52,5412.15) 5882.91,5402.76 ccw(c5892.3,5393.37) v1@5879.02,5393.37 ; v1@5873.52,5402.87 ccw(c5873.52,5425.81) 5889.74,5409.59 ccw(c5905.96,5393.37) v1@5883.02,5393.37 ; v1@7258.47,5743.32 ccw(c7242.26,5727.11) 7242.26,5750.04 ccw(c7242.26,5772.98) v1@7258.47,5756.76 ; v1@7261.3,5746.15 ccw(c7251.91,5736.76) 7251.91,5750.04 ccw(c7251.91,5763.32) v1@7261.3,5753.93
RELAY.RELAY1: LED13.1 R125.1 U8.C10 | length 3809.7
  Top Layer w4: v1@5306.81,5144.66 ccw(c5290.59,5128.44) 5290.59,5151.37 ccw(c5290.59,5174.31) v1@5306.81,5158.09 ; v1@5309.64,5147.49 ccw(c5300.25,5138.1) 5300.25,5151.37 ccw(c5300.25,5164.65) v1@5309.64,5155.26 ; v1(5313.52,5151.37) 5231.37,5151.37 5214.36,5134.36 5214.36,5100 5217.7,5096.66 5217.7,4987.3 5240.9,4964.1 5240.9,4887.75 5228.34,4875.19 5228.34,4835 5228.34,4825.34 5228.34,4823.9 5224,4819.56 5224,4777.52 5228.34,4773.18 5228.34,4724.74 5228.34,4720 5228.34,4710 5228.34,4643.27 ; v1(5365.19,5325.04) 5351.33,5311.18 ; LED13.1@7226.62,5637.4 ccw(c7193.85,5670.17) 7240.19,5670.17 ; LED13.1@7229.45,5634.57 ccw(c7203.51,5660.51) 7240.19,5660.51 ; LED13.1@7232.27,5631.75 ccw(c7213.17,5650.86) 7240.19,5650.86 ; v1@7233.47,5693.32 cw(c7217.26,5677.11) 7240.19,5677.11 cw(c7263.13,5677.11) v1@7246.91,5693.32 ; v1@7236.3,5696.15 cw(c7226.91,5686.76) 7240.19,5686.76 cw(c7253.47,5686.76) v1@7244.08,5696.15 ; LED13.1@7239.12,5624.9 7240.19,5625.96 v1(7240.19,5700.04) ; 7240.19,5645.7 ccw(c7259.93,5645.7) LED13.1@7245.97,5631.75 ; 7240.19,5655.36 ccw(c7269.59,5655.36) LED13.1@7248.8,5634.57 ; 7240.19,5665.02 ccw(c7279.24,5665.02) LED13.1@7251.63,5637.4 ; 5228.34,4643.27 ccw(c5267.02,4643.27) 5239.67,4615.92 ; 5228.34,4643.27 ccw(c5267.02,4643.27) 5239.67,4615.92 ; 5239.67,4615.92 cw(c5227.14,4603.39) 5244.86,4603.39 ccw(c5227.14,4603.39) 5239.67,4615.92 ; 5239.67,4615.92 ccw(c5252.2,4628.45) 5252.2,4610.73 cw(c5252.2,4628.45) 5239.67,4615.92 ; 5342.39,5311.18 cw(c5342.39,5321.82) 5334.46,5314.73 ccw(c5342.39,5321.82) 5342.39,5311.18 ; 5342.38,5311.18 ccw(c5342.38,5300.54) 5334.46,5307.64 cw(c5342.39,5300.54) 5342.39,5311.18 ; 5351.33,5311.18 cw(c5351.33,5329.82) 5337.44,5317.39 ccw(c5351.33,5329.82) 5351.33,5311.18 ; 5351.33,5311.18 ccw(c5351.33,5292.54) 5337.44,5304.97 cw(c5351.33,5292.54) 5351.33,5311.18 ; 5351.33,5311.18 R125.1@5330,5311.18 5351.33,5311.18
  MidLayer1 w4: v1@5306.81,5158.09 ccw(c5290.59,5174.31) 5313.52,5174.31 ccw(c5336.46,5174.31) v1@5320.24,5158.09 ; v1@5309.64,5155.26 ccw(c5300.25,5164.65) 5313.52,5164.65 ccw(c5326.8,5164.65) v1@5317.41,5155.26 ; v1(5313.52,5151.37) 5313.52,5243.04 ; v1@5358.47,5318.32 cw(c5342.26,5302.11) 5365.19,5302.11 cw(c5388.13,5302.11) v1@5371.91,5318.32 ; v1@5361.3,5321.15 cw(c5351.91,5311.76) 5365.19,5311.76 cw(c5378.47,5311.76) v1@5369.08,5321.15 ; v1(5365.19,5325.04) 5365.19,5294.71 ; 5313.52,5243.04 5365.19,5294.71 ; 5313.52,5243.04 5365.19,5294.71
  Bottom Layer w4: v1(5365.19,5325.04) 5406.86,5366.71 5884.84,5366.71 5919.5,5401.37 6147.69,5401.37 6422.35,5676.04 7123.96,5676.04 7160,5640 7205,5640 7240.19,5675.19 v1(7240.19,5700.04) ; v1@5365.19,5330.54 ccw(c5365.19,5343.82) 5374.58,5334.43 ccw(c5383.97,5325.04) v1@5370.69,5325.04 ; v1@5365.19,5334.54 ccw(c5365.19,5357.48) 5381.41,5341.26 ccw(c5397.63,5325.04) v1@5374.69,5325.04 ; v1@7233.47,5693.32 cw(c7217.26,5677.11) 7240.19,5677.11 cw(c7263.13,5677.11) v1@7246.91,5693.32 ; v1@7236.3,5696.15 cw(c7226.91,5686.76) 7240.19,5686.76 cw(c7253.47,5686.76) v1@7244.08,5696.15
RELAY.RELAY2: LED14.1 R127.1 U8.C12 | length 3587.9
  Top Layer w4: v1(5277.52,5183.37) 5336.52,5183.37 5348.52,5171.37 5348.52,5035 5348.52,5010.75 5355.19,5004.08 5355.19,4941.71 5355.19,4930 5355.19,4865.1 5363.5,4856.79 5363.5,4820 5350.5,4807 5337.11,4807 5307.08,4776.97 5307.08,4724.74 5307.08,4720 5307.08,4710 5307.08,4643.27 ccw(c5345.76,4643.27) 5318.41,4615.92 ; v1@5281.41,5179.49 cw(c5290.8,5170.1) 5290.8,5183.37 cw(c5290.8,5196.65) v1@5281.41,5187.26 ; v1@5284.24,5176.66 cw(c5300.46,5160.44) 5300.46,5183.37 cw(c5300.46,5206.31) v1@5284.24,5190.09 ; U8.C12@5323.6,4603.39 ccw(c5305.88,4603.39) 5318.41,4615.92 ; U8.C12@5330.94,4610.73 cw(c5330.94,4628.45) 5318.41,4615.92 ; v1(5876.86,5333.37) 5876.86,5319.18 5884.86,5311.18 R127.1@5910,5311.18 ; R127.1@5902.92,5304.59 ccw(c5887.01,5288.68) 5887.01,5311.18 ccw(c5887.01,5333.68) R127.1@5902.92,5317.77 ; R127.1@5905.75,5307.42 ccw(c5896.67,5298.34) 5896.67,5311.18 ccw(c5896.67,5324.02) R127.1@5905.75,5314.94 ; LED14.1@7239.12,5454.51 7242.99,5458.37 v1(7298.52,5458.37) ; LED14.1@7243.14,5450.49 cw(c7262.18,5431.46) 7262.18,5458.37 ; LED14.1@7245.97,5447.66 cw(c7271.83,5421.8) 7271.83,5458.37 ; LED14.1@7248.8,5444.83 cw(c7281.49,5412.14) 7281.49,5458.37 ; LED14.1@7248.8,5464.19 ccw(c7262.83,5478.22) 7262.83,5458.37 ; LED14.1@7251.63,5442.01 cw(c7291.15,5402.49) v1@7291.15,5458.37 ; LED14.1@7251.63,5467.02 ccw(c7272.49,5487.88) 7272.49,5458.37 ; v1@7291.81,5451.66 ccw(c7275.59,5435.44) 7275.59,5458.37 ccw(c7275.59,5481.31) v1@7291.81,5465.09 ; v1@7294.64,5454.49 ccw(c7285.25,5445.1) 7285.25,5458.37 ccw(c7285.25,5471.65) v1@7294.64,5462.26
  MidLayer2 w4: v1@5270.81,5190.09 ccw(c5254.59,5206.31) 5277.52,5206.31 ccw(c5300.46,5206.31) v1@5284.24,5190.09 ; v1@5273.64,5187.26 ccw(c5264.25,5196.65) 5277.52,5196.65 ccw(c5290.8,5196.65) v1@5281.41,5187.26 ; v1(5277.52,5183.37) 5277.52,5215.37 5362.19,5300.04 5431.86,5300.04 5465.19,5333.37 v1(5876.86,5333.37) ; v1@5870.14,5326.66 ccw(c5853.92,5310.44) 5853.92,5333.37 ccw(c5853.92,5356.31) v1@5870.14,5340.09 ; v1@5872.97,5329.49 ccw(c5863.58,5320.1) 5863.58,5333.37 ccw(c5863.58,5346.65) v1@5872.97,5337.26
  Bottom Layer w4: v1(5876.86,5333.37) 7141.77,5333.37 7157.94,5317.21 7177.21,5317.21 7215.54,5355.54 7270.54,5355.54 7298.52,5383.52 v1(7298.52,5458.37) ; v1@5880.75,5329.49 cw(c5890.14,5320.1) 5890.14,5333.37 cw(c5890.14,5346.65) v1@5880.75,5337.26 ; v1@5883.57,5326.66 cw(c5899.79,5310.44) 5899.79,5333.37 cw(c5899.79,5356.31) v1@5883.57,5340.09 ; v1@7291.81,5451.66 cw(c7275.59,5435.44) 7298.52,5435.44 cw(c7321.46,5435.44) v1@7305.24,5451.66 ; v1@7294.64,5454.49 cw(c7285.25,5445.1) 7298.52,5445.1 cw(c7311.8,5445.1) v1@7302.41,5454.49
RELAY.RELAY3: LED15.1 R129.1 U8.B12 | length 3017.7
  Top Layer w4: U8.B12@5323.6,4642.76 ccw(c5305.88,4642.76) 5318.41,4655.29 ; U8.B12@5330.94,4650.1 cw(c5330.94,4667.83) 5318.41,4655.29 ; 5361.45,4806.63 5353.81,4799 ; v1@5364.02,5175.04 cw(c5341.09,5175.04) 5357.31,5158.82 cw(c5373.52,5142.61) v1@5373.52,5165.54 ; v1@5368.02,5175.04 cw(c5354.75,5175.04) 5364.13,5165.65 cw(c5373.52,5156.26) v1@5373.52,5169.54 ; v1(5373.52,5175.04) 5356.86,5158.37 5356.86,5025 5356.86,5013.73 5363.19,5007.39 5363.19,4966.71 5363.19,4950 5363.19,4868.41 5371.5,4860.1 5371.5,4816.69 5353.81,4799 ; R129.1@6505,5311.18 6523.86,5311.18 ; R129.1@6513.01,5305.68 cw(c6523.86,5297.74) 6523.86,5311.18 ; R129.1@6513.01,5316.68 ccw(c6523.86,5324.62) 6523.86,5311.18 ; 6522.54,5312.49 cw(c6509.85,5299.8) v1@6526.7,5293.61 ; 6526.97,5308.07 cw(c6516.32,5297.43) v1@6530.45,5292.23 ; 6531.39,5303.65 cw(c6522.79,5295.05) v1@6534.2,5290.84 ; v1(6531.86,5291.71) 6531.86,5303.18 6523.86,5311.18 ; v1(7231.86,5333.37) 7231.86,5318.64 7239.12,5311.37 ; LED15.1@7231.92,5300.28 ccw(c7226.97,5311.37) 7239.12,5311.37 ; LED15.1@7233.55,5296.62 ccw(c7229.72,5305.21) 7239.12,5305.21 ccw(c7248.53,5305.21) LED15.1@7244.7,5296.62 ; LED15.1@7239.12,5284.12 7239.12,5311.37 ; LED15.1@7246.33,5300.28 cw(c7251.27,5311.37) 7239.12,5311.37 ; 5318.41,4655.29 cw(c5325.59,4662.47) 5315.44,4662.47 5315.44,4710 5315.44,4720 5315.44,4724.74 5315.44,4774.01 5340.42,4799 5353.81,4799
  Bottom Layer w4: v1(5373.52,5175.04) 5506.86,5308.37 5513.98,5315.5 5900,5315.5 5909.87,5325.37 6498.19,5325.37 v1(6531.86,5291.71) 6565.19,5325.04 7138.79,5325.04 7156.84,5307 7205.48,5307 v1(7231.86,5333.37) ; v1@6522.36,5291.71 ccw(c6499.42,5291.71) 6515.64,5307.93 ccw(c6531.86,5324.14) 6531.86,5301.21 ccw(c6531.86,5324.14) 6548.07,5307.93 ccw(c6564.29,5291.71) v1@6541.36,5291.71 ; v1@6526.36,5291.71 ccw(c6513.08,5291.71) 6522.47,5301.1 ccw(c6531.86,5310.49) 6531.86,5297.21 ccw(c6531.86,5310.49) 6541.25,5301.1 ccw(c6550.64,5291.71) v1@6537.36,5291.71 ; v1@7222.36,5333.37 cw(c7199.42,5333.37) 7215.64,5317.16 cw(c7231.86,5300.94) v1@7231.86,5323.87 ; v1@7226.36,5333.37 cw(c7213.08,5333.37) 7222.47,5323.99 cw(c7231.86,5314.6) v1@7231.86,5327.87
RELAYS#.C0: J14.2 RLY1.3 RLY1.6 | length 872.6
  Top Layer w30: J14.2@4999.71,5880 ccw(c5071.45,5880) 5020.72,5829.28 ; J14.2@5003.37,5880 5003.37,5846.63 5167.6,5682.4 RLY1.6@5167.6,5481.22 RLY1.3@5167.6,5245 ; J14.2@5029.71,5880 ccw(c5173.87,5880) 5071.94,5778.06
RELAYS#.C1: J14.5 RLY2.3 RLY2.6 | length 796.5
  Top Layer w30: J14.5@5593.93,5853.66 cw(c5593.93,5790.07) 5638.89,5835.04 cw(c5683.85,5880) J14.5@5620.26,5880 ; J14.5@5593.93,5880 5742.6,5731.33 RLY2.6@5742.6,5481.22 RLY2.3@5742.6,5245
RELAYS#.C2: J14.8 RLY3.3 RLY3.6 | length 800.4
  Top Layer w30: J14.8@6184.48,5853.66 cw(c6184.48,5790.07) 6229.44,5835.04 cw(c6274.4,5880) J14.8@6210.82,5880 ; J14.8@6184.48,5880 6342.6,5721.88 RLY3.6@6342.6,5481.22 RLY3.3@6342.6,5245
RELAYS#.C3: J14.11 RLY4.3 RLY4.6 | length 895.4
  Top Layer w30: J14.11@6775.03,5880 6775.03,5824.97 ; RLY4.3@6922.6,5245 RLY4.6@6922.6,5481.22 6922.6,5747.4 6860,5810 6790,5810 6775.03,5824.97 ; 6775.03,5824.98 cw(c6819.34,5824.98) 6791.55,5859.49 ccw(c6819.34,5824.98) 6775.03,5824.98 ; 6775.03,5824.98 ccw(c6730.72,5824.98) 6758.51,5859.49 cw(c6730.72,5824.98) 6775.03,5824.98
RELAYS#.NC0: J14.1 RLY1.2 RLY1.7 | length 930.6
  Top Layer w30: J14.1@4787.9,5861.38 cw(c4742.94,5816.41) 4806.52,5816.41 cw(c4870.11,5816.41) J14.1@4825.15,5861.38 ; J14.1@4806.52,5880 4806.52,5768.48 4855,5720 4995,5720 5035,5680 5035,5510 5072.38,5472.62 5080.98,5464.02 RLY1.2@5080.98,5245
RELAYS#.NC1: J14.4 RLY2.2 RLY2.7 | length 944.6
  Top Layer w30: J14.4@5378.45,5861.38 cw(c5333.49,5816.41) 5397.07,5816.41 cw(c5460.66,5816.41) J14.4@5415.7,5861.38 ; J14.4@5397.08,5880 5397.08,5732.92 5445,5685 5620,5685 5655.98,5649.02 RLY2.7@5655.98,5481.22 RLY2.2@5655.98,5245
RELAYS#.NC2: J14.7 RLY3.2 RLY3.7 | length 846
  Top Layer w30: J14.7@5987.63,5853.66 cw(c5987.63,5790.07) 6032.59,5835.04 cw(c6077.55,5880) J14.7@6013.96,5880 ; J14.7@5987.63,5880 6255.98,5611.64 RLY3.7@6255.98,5481.22 RLY3.2@6255.98,5245
RELAYS#.NC3: J14.10 RLY4.2 RLY4.7 | length 950
  Top Layer w30: J14.10@6559.55,5861.38 cw(c6514.59,5816.41) 6578.18,5816.41 cw(c6641.76,5816.41) J14.10@6596.8,5861.38 ; J14.10@6578.18,5880 6578.18,5781.82 6620,5740 6805,5740 6835.98,5709.02 RLY4.7@6835.98,5481.22 RLY4.2@6835.98,5245
RELAYS#.NO0: J14.3 RLY1.4 RLY1.5 | length 757.2
  Top Layer w30: J14.3@5181.6,5861.38 cw(c5136.64,5816.41) 5200.22,5816.41 cw(c5263.81,5816.41) J14.3@5218.85,5861.38 ; J14.3@5200.22,5880 5200.22,5778.99 5254.21,5725 RLY1.5@5254.21,5481.22 RLY1.4@5254.21,5245
RELAYS#.NO1: J14.6 RLY2.4 RLY2.5 | length 750.8
  Top Layer w30: J14.6@5772.15,5861.38 cw(c5727.19,5816.41) 5790.78,5816.41 cw(c5854.36,5816.41) J14.6@5809.4,5861.38 ; J14.6@5790.78,5880 5790.78,5808.44 5829.21,5770 RLY2.5@5829.21,5481.22 RLY2.4@5829.21,5245
RELAYS#.NO2: J14.9 RLY3.4 RLY3.5 | length 754.7
  Top Layer w30: J14.9@6362.7,5861.38 cw(c6317.74,5816.41) 6381.33,5816.41 cw(c6444.91,5816.41) J14.9@6399.95,5861.38 ; J14.9@6381.33,5880 6381.33,5790 6429.21,5742.11 RLY3.5@6429.21,5481.22 RLY3.4@6429.21,5245
RELAYS#.NO3: J14.12 RLY4.4 RLY4.5 | length 750.3
  Top Layer w30: J14.12@6953.25,5861.38 cw(c6908.29,5816.41) 6971.88,5816.41 cw(c7035.47,5816.41) J14.12@6990.5,5861.38 ; J14.12@6971.88,5880 6971.88,5798.12 7009.21,5760.79 RLY4.5@7009.21,5481.22 RLY4.4@7009.21,5245
RS232.CTS: R210.1 U8.J2 | length 5393.6
  Top Layer w4: v1@4514.29,4427.37 cw(c4519.44,4414.08) 4529.53,4424.16 ; v1@4515.73,4423.64 cw(c4521.87,4407.82) 4533.87,4419.82 ; v1@4525.21,4425.04 v1(4515.19,4425.04) 4528.65,4425.04 4535.82,4417.87 4750,4417.87 4767.39,4417.87 4802.58,4382.67 4807.58,4382.67 4820,4382.67 4855.26,4382.67 4860,4382.67 4870,4382.67 4917.53,4382.67 cw(c4917.53,4372.52) 4924.71,4379.7 ; U8.J2@4929.9,4367.17 ccw(c4912.17,4367.17) 4924.71,4379.7 ; U8.J2@4937.24,4374.51 cw(c4937.24,4392.23) 4924.71,4379.7
  MidLayer2 w4: v1@619.19,5160.87 cw(c619.19,5137.94) 635.41,5154.16 cw(c651.63,5170.37) v1@628.69,5170.37 ; v1@619.19,5164.87 cw(c619.19,5151.6) 628.58,5160.99 cw(c637.97,5170.37) v1@624.69,5170.37 ; v1(619.19,5170.37) 665.02,5124.54 1330.48,5124.54 1330.98,5125.04 1673.52,5125.04 1781.86,5016.71 3723.52,5016.71 3956.86,4783.37 4281.86,4783.37 4515.19,4550.04 v1(4515.19,4425.04) ; v1@4508.47,4431.76 ccw(c4492.26,4447.98) 4515.19,4447.98 ccw(c4538.13,4447.98) v1@4521.91,4431.76 ; v1@4511.3,4428.93 ccw(c4501.91,4438.32) 4515.19,4438.32 ccw(c4528.47,4438.32) v1@4519.08,4428.93
  Bottom Layer w4: R210.1@489.34,5413 cw(c473.43,5397.09) 495.93,5397.09 cw(c518.43,5397.09) R210.1@502.52,5413 ; R210.1@492.17,5415.82 cw(c483.09,5406.74) 495.93,5406.74 cw(c508.77,5406.74) R210.1@499.69,5415.82 ; R210.1@495.93,5420.08 495.93,5380.93 479.63,5364.63 479.63,5195 504.25,5170.37 v1(619.19,5170.37) v1@615.19,5174.37 ; v1@612.47,5163.66 ccw(c596.26,5147.44) 596.26,5170.37 ccw(c596.26,5193.31) v1@612.47,5177.09 ; v1@615.3,5166.49 ccw(c605.91,5157.1) 605.91,5170.37 ccw(c605.91,5183.65) v1@615.3,5174.26
RS232.RTS: U8.E3 U59.10 | length 6278.2
  Top Layer w4: v1@4540.19,5098.87 cw(c4540.19,5075.94) 4556.41,5092.16 cw(c4572.63,5108.37) v1@4549.69,5108.37 ; v1@4540.19,5102.87 cw(c4540.19,5089.6) 4549.58,5098.99 cw(c4558.97,5108.37) v1@4545.69,5108.37 ; v1(4540.19,5108.37) 4565.19,5083.37 4565.19,4816.71 4656.86,4725.04 4656.86,4586.36 4680.5,4562.71 4832.19,4562.71 4846.39,4548.51 4855.26,4548.51 4860,4548.51 4870,4548.51 4936.73,4548.51 ; 4936.73,4548.51 cw(c4936.73,4509.83) 4964.08,4537.18 ; 4936.73,4548.51 cw(c4936.73,4509.83) 4964.08,4537.18 ; 4964.08,4537.18 ccw(c4976.61,4549.71) 4976.61,4531.99 cw(c4976.61,4549.71) 4964.08,4537.18 ; 4964.08,4537.18 cw(c4951.55,4524.65) 4969.27,4524.65 ccw(c4951.55,4524.65) 4964.08,4537.18
  MidLayer1 w4: v1(380,5460) 445,5460 450,5455 v4(532.81,5455) ; v1@383.89,5456.11 cw(c393.28,5446.72) 393.28,5460 cw(c393.28,5473.28) v1@383.89,5463.89 ; v1@386.72,5453.28 cw(c402.93,5437.06) 402.93,5460 cw(c402.93,5482.93) v1@386.72,5466.72 ; v4@525.87,5448.06 ccw(c509.13,5431.31) 509.13,5455 ccw(c509.13,5478.69) v4@525.87,5461.94 ; v4@528.7,5450.89 ccw(c518.78,5440.97) 518.78,5455 ccw(c518.78,5469.03) v4@528.7,5459.11
  MidLayer2 w4: v1(380,5460) 406.19,5486.19 406.19,5527.5 469.55,5590.86 1869.14,5590.86 1905,5555 ; v1@380,5465.5 ccw(c380,5478.78) 389.39,5469.39 ccw(c398.78,5460) v1@385.5,5460 ; v1@380,5469.5 ccw(c380,5492.43) 396.22,5476.22 ccw(c412.43,5460) v1@389.5,5460 ; 1870,5590 1905,5555 ; v1@4530.69,5108.37 ccw(c4507.76,5108.37) 4523.97,5124.59 ccw(c4540.19,5140.81) v1@4540.19,5117.87 ; v1@4534.69,5108.37 ccw(c4521.41,5108.37) 4530.8,5117.76 ccw(c4540.19,5127.15) v1@4540.19,5113.87 ; v1(4540.19,5108.37) 4506.86,5141.71 3431.67,5141.71 3347,5226.37 3347,5298 3336.86,5308.14 3182.09,5308.14 3031.86,5458.37 2545.54,5458.37 2516.38,5487.54 2212.54,5487.54 2206.88,5481.88 2133.7,5481.88 2092.77,5522.81 2007.19,5522.81 1975,5555 1905,5555
  Bottom Layer w4: v4(532.81,5455) 540,5455 560.08,5455 595,5420.08 U59.10@704.59,5420.08 ; v4@536.92,5450.89 cw(c546.84,5440.97) 546.84,5455 cw(c546.84,5469.03) v4@536.92,5459.11 ; v4@539.75,5448.06 cw(c556.5,5431.31) 556.5,5455 cw(c556.5,5478.69) v4@539.75,5461.94 ; U59.10@674.61,5411.75 ccw(c654.5,5391.64) 654.5,5420.08 ccw(c654.5,5448.52) U59.10@674.61,5428.41 ; U59.10@677.44,5414.58 ccw(c664.16,5401.3) 664.16,5420.08 ccw(c664.16,5438.86) U59.10@677.44,5425.58
RS232.RXD: R209.1 U8.G2 | length 5604.1
  Top Layer w4: v1@4615.19,4490.54 cw(c4615.19,4467.61) 4631.41,4483.82 cw(c4647.63,4500.04) v1@4624.69,4500.04 ; v1@4615.19,4491.71 v1(4615.19,4500.04) 4657.36,4457.87 4769,4457.87 4783.95,4457.87 4787.45,4461.37 4797.69,4461.37 4819,4461.37 4848.52,4461.37 ; v1@4615.19,4494.54 cw(c4615.19,4481.26) 4624.58,4490.65 cw(c4633.97,4500.04) v1@4620.69,4500.04 ; 4848.52,4461.41 4851.26,4461.41 4855.26,4461.41 4860,4461.41 4870,4461.41 4917.53,4461.41 ; 4917.53,4461.41 cw(c4917.53,4451.26) 4924.71,4458.44 ; 4917.53,4461.41 cw(c4917.53,4451.26) 4924.71,4458.44 ; 4924.71,4458.44 cw(c4912.17,4445.91) 4929.9,4445.91 ccw(c4912.17,4445.91) 4924.71,4458.44 ; 4924.71,4458.44 ccw(c4937.24,4470.97) 4937.24,4453.25 cw(c4937.24,4470.97) 4924.71,4458.44
  Bottom Layer w4: R209.1@489.34,5558 cw(c473.43,5542.09) 495.93,5542.09 cw(c518.43,5542.09) R209.1@502.52,5558 ; R209.1@492.17,5560.82 cw(c483.09,5551.74) 495.93,5551.74 cw(c508.77,5551.74) R209.1@499.69,5560.82 ; R209.1@495.93,5565.08 495.93,5540 515,5520.93 515,5355 536.63,5333.37 701.63,5333.37 715.52,5319.48 715.52,5065 737.71,5042.81 1247.38,5042.81 1256.81,5033.37 1323.52,5033.37 1353.66,5003.24 1373.36,4983.54 3812.3,4983.54 3821.29,4974.54 3868.23,4974.54 3891.69,4998 4087.19,4998 4097.81,4987.38 4097.81,4972.19 4286.29,4783.71 4598.19,4783.71 4648.52,4733.37 4648.52,4533.37 v1(4615.19,4500.04) ; v1@4615.19,4505.54 ccw(c4615.19,4518.82) 4624.58,4509.43 ccw(c4633.97,4500.04) v1@4620.69,4500.04 ; v1@4615.19,4509.54 ccw(c4615.19,4532.48) 4631.41,4516.26 ccw(c4647.63,4500.04) v1@4624.69,4500.04
RS232.TXD: U8.B1 U59.11 | length 5035.1
  Top Layer w4: v1@4743.86,4745.21 cw(c4743.86,4722.27) 4760.07,4738.49 cw(c4776.29,4754.71) v1@4753.36,4754.71 ; v1@4743.86,4749.21 cw(c4743.86,4735.93) 4753.25,4745.32 cw(c4762.64,4754.71) v1@4749.36,4754.71 ; v1(4743.86,4754.71) 4825,4673.56 4825,4660 4842.24,4642.76 4860,4642.76 4870,4642.76 U8.B1@4897.87,4642.76 ; U8.B1@4892.57,4637.45 ccw(c4879.77,4624.65) 4879.77,4642.76 ccw(c4879.77,4660.86) U8.B1@4892.57,4648.06 ; U8.B1@4892.68,4637.56 ccw(c4880.15,4625.03) 4880.15,4642.76 ccw(c4880.15,4660.48) U8.B1@4892.68,4647.95
  Bottom Layer w4: U59.11@700.52,5470 745,5470 ; U59.11@736.82,5464.9 cw(c745,5460.9) 745,5470 ; U59.11@736.89,5475.13 ccw(c745,5478.98) 745,5470 ; v1@4734.36,4754.71 ccw(c4711.42,4754.71) 4727.64,4770.93 ccw(c4743.86,4787.14) v1@4743.86,4764.21 ; v1@4738.36,4754.71 ccw(c4725.08,4754.71) 4734.47,4764.1 ccw(c4743.86,4773.49) v1@4743.86,4760.21 ; v1(4743.86,4754.71) 4715.19,4783.37 4640.19,4783.37 4631.86,4791.71 4290.19,4791.71 4105.81,4976.09 4105.81,4990.69 4090.5,5006 3888.37,5006 3864.91,4982.54 3824.61,4982.54 3815.61,4991.54 1376.68,4991.54 1326.01,5042.2 1259.3,5042.2 1250.69,5050.81 742.71,5050.81 723.52,5070 723.52,5323.52 750,5350 750,5465 745,5470
RS232_C1+: C148.1 U59.1 | length 305
  Bottom Layer w4: U59.1@929,5720.08 1019.92,5720.08 1029.92,5710.08 C148.1@1096.44,5710.08 ; U59.1@956.15,5714.58 cw(c969.43,5701.3) 969.43,5720.08 cw(c969.43,5738.86) U59.1@956.15,5725.58 ; U59.1@958.98,5711.75 cw(c979.09,5691.64) 979.09,5720.08 cw(c979.09,5748.52) U59.1@958.98,5728.41 ; C148.1@1089.5,5703.14 ccw(c1072.76,5686.39) 1072.76,5710.08 ccw(c1072.76,5733.76) C148.1@1089.5,5717.01 ; C148.1@1092.33,5705.97 ccw(c1082.41,5696.05) 1082.41,5710.08 ccw(c1082.41,5724.11) C148.1@1092.33,5714.19
RS232_C1-: C148.2 U59.3 | length 420.5
  Bottom Layer w4: U59.3@929,5620.08 1117.86,5620.08 1137.78,5640 C148.2@1137.78,5710.08 ; U59.3@956.15,5614.58 cw(c969.43,5601.3) 969.43,5620.08 cw(c969.43,5638.86) U59.3@956.15,5625.58 ; U59.3@958.98,5611.75 cw(c979.09,5591.64) 979.09,5620.08 cw(c979.09,5648.52) U59.3@958.98,5628.41 ; C148.2@1130.84,5703.14 cw(c1114.09,5686.39) 1137.78,5686.39 cw(c1161.47,5686.39) C148.2@1144.72,5703.14 ; C148.2@1133.67,5705.97 cw(c1123.75,5696.05) 1137.78,5696.05 cw(c1151.81,5696.05) C148.2@1141.89,5705.97
RS232_C2+: C150.1 U59.4 | length 302.9
  Bottom Layer w4: U59.4@929,5570.08 1024.92,5570.08 1029.92,5565.08 C150.1@1096.44,5565.08 ; U59.4@956.15,5564.58 cw(c969.43,5551.3) 969.43,5570.08 cw(c969.43,5588.86) U59.4@956.15,5575.58 ; U59.4@958.98,5561.75 cw(c979.09,5541.64) 979.09,5570.08 cw(c979.09,5598.52) U59.4@958.98,5578.41 ; C150.1@1089.5,5558.14 ccw(c1072.76,5541.39) 1072.76,5565.08 ccw(c1072.76,5588.76) C150.1@1089.5,5572.01 ; C150.1@1092.33,5560.97 ccw(c1082.41,5551.05) 1082.41,5565.08 ccw(c1082.41,5579.11) C150.1@1092.33,5569.19
RS232_C2-: C150.2 U59.5 | length 382.7
  Bottom Layer w4: U59.5@929,5520.08 1130.08,5520.08 1137.78,5527.78 C150.2@1137.78,5565.08 ; U59.5@956.15,5514.58 cw(c969.43,5501.3) 969.43,5520.08 cw(c969.43,5538.86) U59.5@956.15,5525.58 ; U59.5@958.98,5511.75 cw(c979.09,5491.64) 979.09,5520.08 cw(c979.09,5548.52) U59.5@958.98,5528.41 ; C150.2@1130.84,5558.14 cw(c1114.09,5541.39) 1137.78,5541.39 cw(c1161.47,5541.39) C150.2@1144.72,5558.14 ; C150.2@1133.67,5560.97 cw(c1123.75,5551.05) 1137.78,5551.05 cw(c1151.81,5551.05) C150.2@1141.89,5560.97
RS232_CTS#: R210.2 U59.9 | length 310.6
  Bottom Layer w4: R210.2@538.29,5410.27 cw(c538.29,5382.64) 557.82,5402.18 ; R210.2@538.29,5414.27 cw(c538.29,5396.3) 551,5409 ; R210.2@538.29,5420.08 539.92,5420.08 589.92,5370.08 U59.9@704.59,5370.08 ; R210.2@547.61,5419.59 ccw(c564.98,5419.59) 552.7,5407.3 ; U59.9@674.61,5361.75 ccw(c654.5,5341.64) 654.5,5370.08 ccw(c654.5,5398.52) U59.9@674.61,5378.41 ; U59.9@677.44,5364.58 ccw(c664.16,5351.3) 664.16,5370.08 ccw(c664.16,5388.86) U59.9@677.44,5375.58
RS232_RX#: R209.2 U59.12 | length 314.6
  Bottom Layer w4: R209.2@538.29,5555.27 cw(c538.29,5531.58) 555.04,5548.33 ; R209.2@538.29,5559.27 cw(c538.29,5545.24) R209.2@548.21,5555.16 ; R209.2@538.29,5565.08 583.29,5520.08 U59.12@704.59,5520.08 ; R209.2@543.61,5564.59 ccw(c555.26,5564.59) R209.2@547.02,5556.35 ; R209.2@547.61,5564.59 ccw(c568.92,5564.59) 553.85,5549.52 ; U59.12@674.61,5511.75 ccw(c654.5,5491.64) 654.5,5520.08 ccw(c654.5,5548.52) U59.12@674.61,5528.41 ; U59.12@677.44,5514.58 ccw(c664.16,5501.3) 664.16,5520.08 ccw(c664.16,5538.86) U59.12@677.44,5525.58
RS232_V+: C149.2 U59.2 | length 542.2
  Bottom Layer w4: C149.2@537.78,5710.08 593.76,5710.08 608.84,5695 785,5695 810,5670 U59.2@930,5670 ; C149.2@541.89,5705.97 cw(c551.81,5696.05) 551.81,5710.08 cw(c551.81,5724.11) C149.2@541.89,5714.19 ; C149.2@544.72,5703.14 cw(c561.47,5686.39) 561.47,5710.08 cw(c561.47,5733.76) C149.2@544.72,5717.01 ; 878.72,5670 ccw(c878.72,5698.7) U59.2@899.02,5678.41 ; 879.1,5670 cw(c879.1,5641.83) U59.2@899.02,5661.75 ; 888.38,5670 ccw(c888.38,5689.05) U59.2@901.85,5675.58 ; 888.75,5670 cw(c888.75,5651.48) U59.2@901.85,5664.58
RS232_V-: C151.1 U59.6 | length 277
  Bottom Layer w4: U59.6@929,5470.08 1029.92,5470.08 1040,5460 1040,5435 1054.92,5420.08 C151.1@1096.44,5420.08 ; U59.6@956.15,5464.58 cw(c969.43,5451.3) 969.43,5470.08 cw(c969.43,5488.86) U59.6@956.15,5475.58 ; U59.6@958.98,5461.75 cw(c979.09,5441.64) 979.09,5470.08 cw(c979.09,5498.52) U59.6@958.98,5478.41